# Altium PCB Counts_PCB.PcbDoc (part 2 of 2)
Units mil, origin at the board's own origin, x right, y up, seen from the top; angles counter-clockwise.
Board outline 3474.97 x 2159.98 mil, 2 copper layers (Top Layer, Bottom Layer); 162 components, 85 nets, 521 pads, 0 vias.
Unrouted connection lines stored in the file: 338.
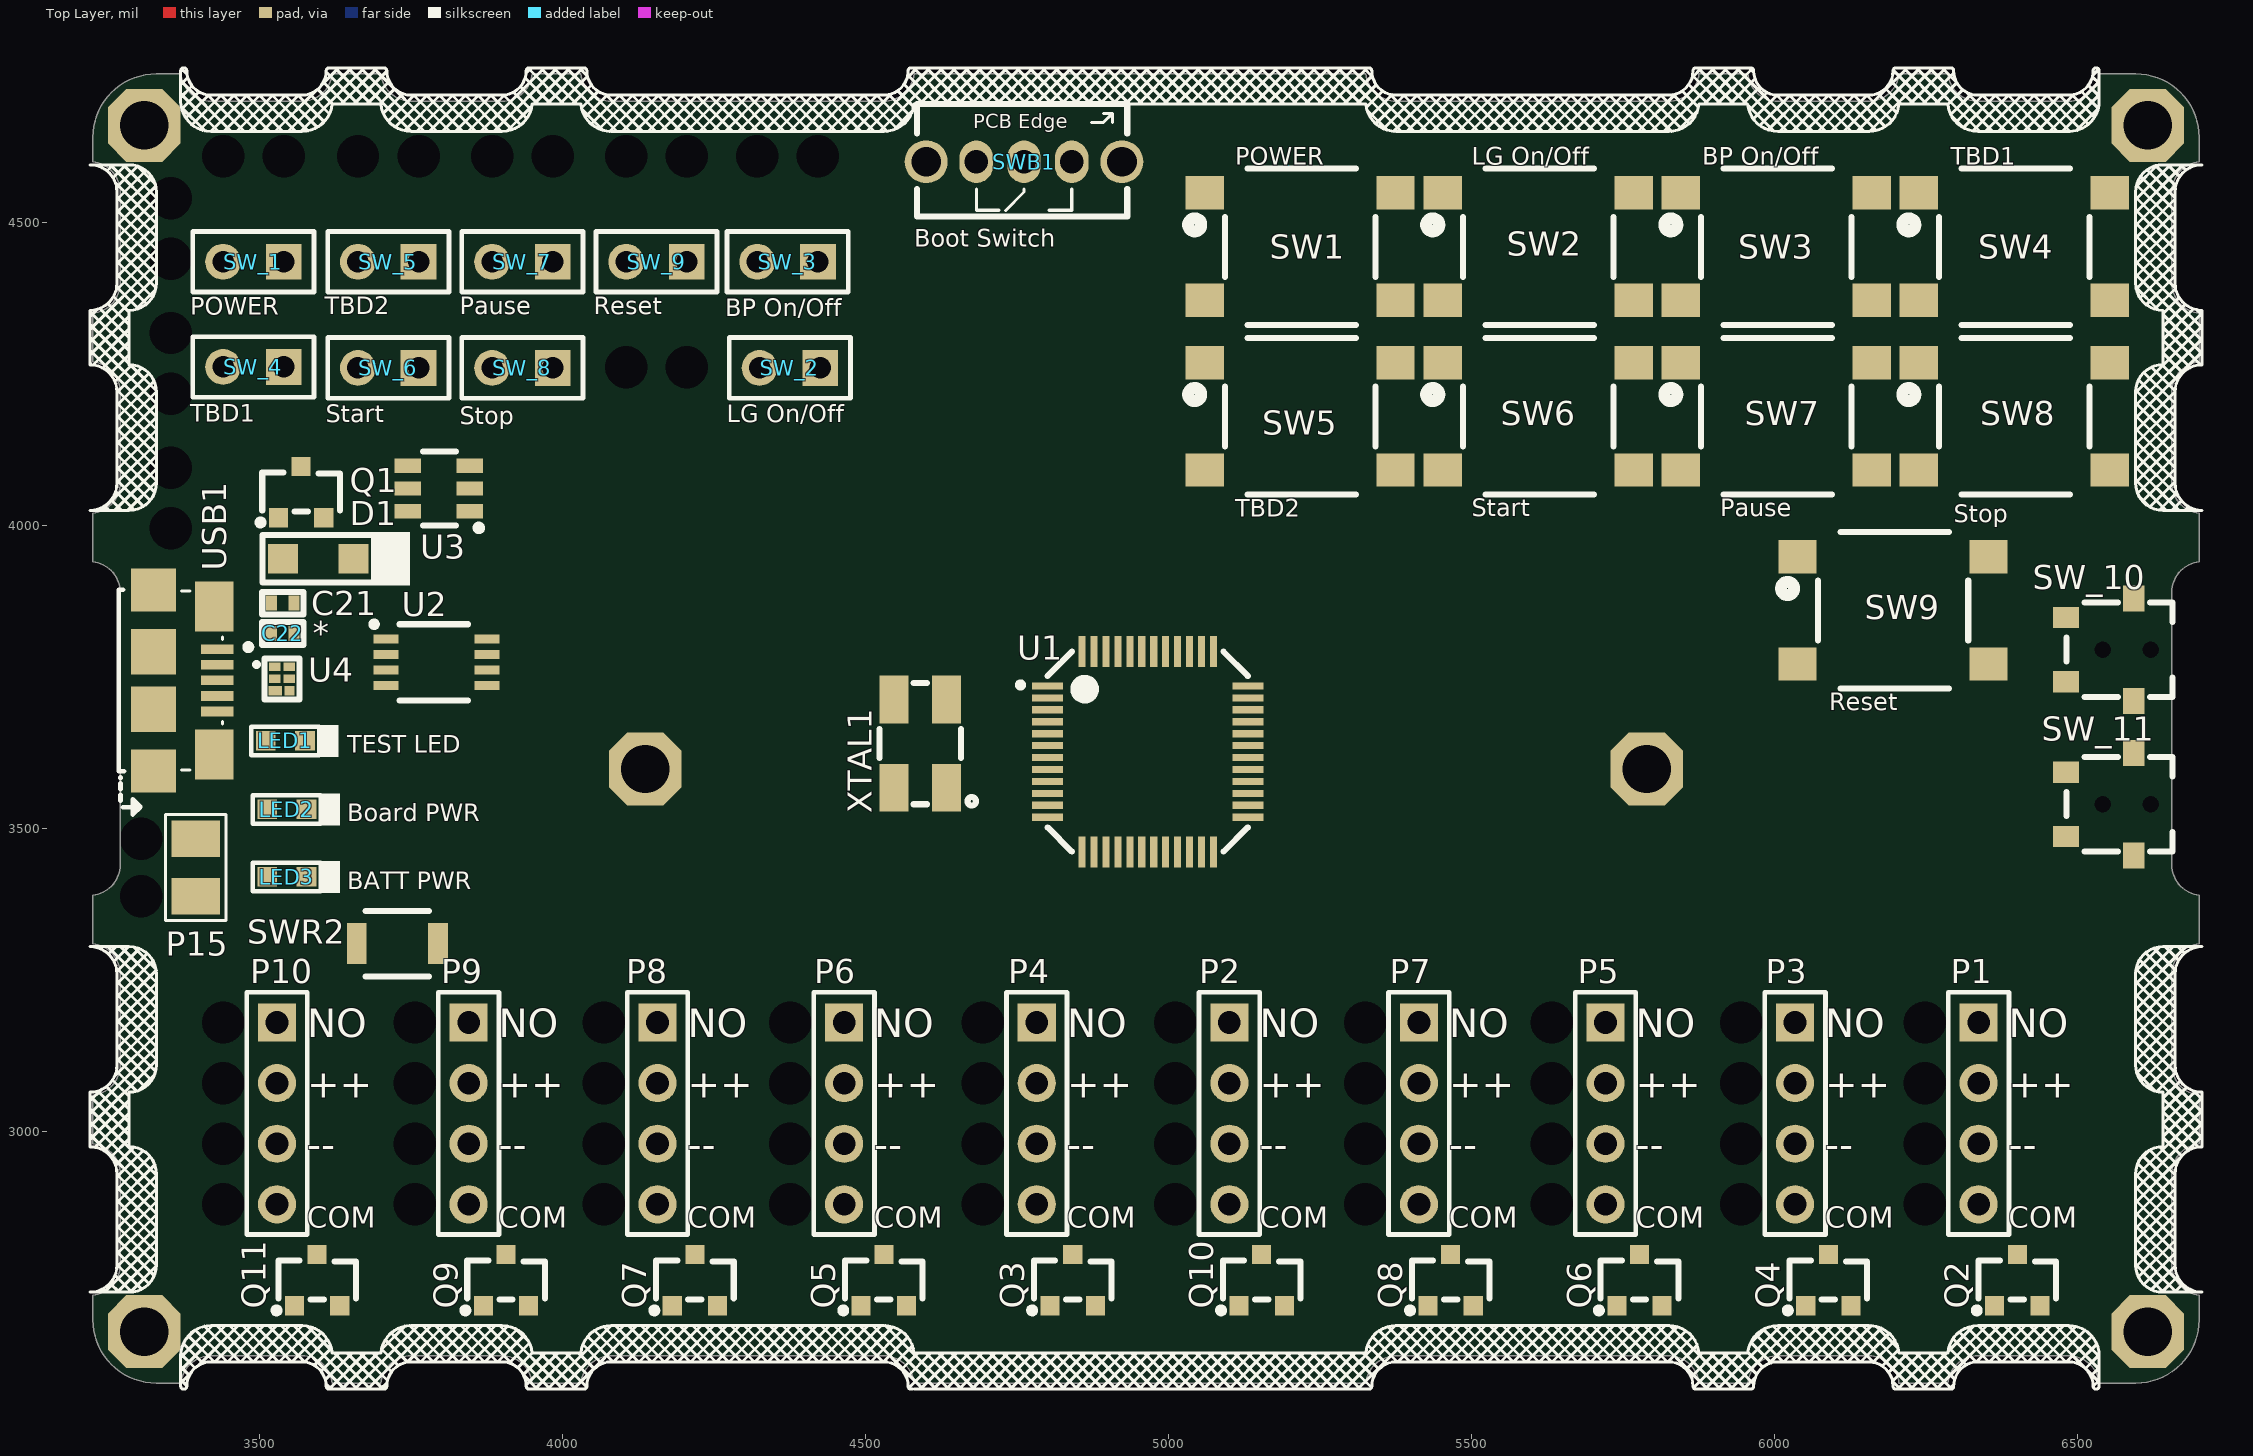
[diagram p0: Top Layer view]

## Part data (continued)
R10: library part ERJ-2GEJ102X, "RES SMD 1K OHM 5% 1/10W 0402", Case/Package=0402, Case Code (Metric)=1005, Manufacturer=Panasonic, Max Operating Temperature=155°C, Max Power Dissipation=100mW, Min Operating Temperature=-55°C, Package Quantity=1, Resistance=1kR, Supplier Part Number 1=P1.0KJCT-ND, Temperature Coefficient=200ppm/°C, Tolerance=5%, Voltage Rating=50V, Case Code (Imperial)=0402, ComponentLink1Description=https://industrial.panasonic.com/cdbs/www-data/pdf/RDA0000/AOA0000C301.pdf?src-supplier=Future+Electronics, ComponentLink1URL=https://industrial.panasonic.com/cdbs/www-data/pdf/RDA0000/AOA0000C301.pdf?src-supplier=Future+Electronics, ComponentLink2Description=http://www.jameco.com/Jameco/Products/ProdDS/1986781.pdf?src-supplier=Jameco, ComponentLink2URL=http://www.jameco.com/Jameco/Products/ProdDS/1986781.pdf?src-supplier=Jameco, ComponentLink3Description=http://www.farnell.com/datasheets/2059623.pdf?src-supplier=Farnell, ComponentLink3URL=http://www.farnell.com/datasheets/2059623.pdf?src-supplier=Farnell, ComponentLink4Description=http://industrial.panasonic.com/www-data/pdf/AOA0000/AOA0000CE1.pdf?src-supplier=Avnet, ComponentLink4URL=http://industrial.panasonic.com/www-data/pdf/AOA0000/AOA0000CE1.pdf?src-supplier=Avnet, ComponentLink5Description=http://www.alliedelec.com/m/d/51cd0790071e1666bdb9d00c57fcf960.pdf?src-supplier=Allied+Electronics, ComponentLink5URL=http://www.alliedelec.com/m/d/51cd0790071e1666bdb9d00c57fcf960.pdf?src-supplier=Allied+Electronics, ComponentLink6Description=http://industrial.panasonic.com/www-data/pdf/AOA0000/AOA0000CE1.pdf?src-supplier=Avnet+Europe, ComponentLink6URL=http://industrial.panasonic.com/www-data/pdf/AOA0000/AOA0000CE1.pdf?src-supplier=Avnet+Europe, ComponentLink7Description=http://www.farnell.com/datasheets/2059623.pdf?src-supplier=Element14, ComponentLink7URL=http://www.farnell.com/datasheets/2059623.pdf?src-supplier=Element14, ComponentLink8Description=http://industrial.panasonic.com/cdbs/www-data/pdf/RDA0000/AOA0000C301.pdf?src-supplier=Farnell, ComponentLink8URL=http://industrial.panasonic.com/cdbs/www-data/pdf/RDA0000/AOA0000C301.pdf?src-supplier=Farnell, ComponentLink9Description=http://industrial.panasonic.com/www-data/pdf/AOA0000/AOA0000CE1.pdf?src-supplier=Avnet+Asia, ComponentLink9URL=http://industrial.panasonic.com/www-data/pdf/AOA0000/AOA0000CE1.pdf?src-supplier=Avnet+Asia, Composition="Thick Film", Contact Plating=Tin, Depth=0.5mm, Features="Automotive AEC-Q200", Height=0.35mm, Lead Free="Lead Free", Length=1mm, Manufacturer Part Number=ERJ-2GEJ102X, Military Standard=Not, Mount="Surface Mount", Number of Terminations=2, Packaging="Tape and Reel", Power Rating=100mW, Pricing 1="1=0.1, 10=0.032, 100=0.0129, 1000=0.00578, 2500=0.00502, 5000=0.00414 (USD)", Radiation Hardening=No, REACH SVHC="No SVHC", Stock 1=3855795, Supplier 1=Digi-Key, Termination=SMD/SMT, Voltage Rating (DC)=50V, Width=0.02inch, Working Voltage=50V
R31 R33 R35 R37 R39 R41 R43 R45 R47 R49: library part RC0402FR-074K7L, "RES SMD 4.7K OHM 1% 1/16W 0402", Case/Package=0402, Case Code (Metric)=1005, Manufacturer=Yageo, Max Operating Temperature=155°C, Min Operating Temperature=-55°C, Power Rating=62.5mW, Resistance=4.7kR, Supplier Part Number 1=311-4.7KLRCT-ND, Temperature Coefficient=100ppm/°C, Tolerance=1%, Voltage Rating=50V, Case Code (Imperial)=0402, ComponentLink1Description=http://www.farnell.com/datasheets/1018594.pdf?src-supplier=Element14, ComponentLink1URL=http://www.farnell.com/datasheets/1018594.pdf?src-supplier=Element14, ComponentLink2Description=https://www.verical.com/server-webapp/html/getDatasheet?partID=328119&src-supplier=Verical, ComponentLink2URL=https://www.verical.com/server-webapp/html/getDatasheet?partID=328119&src-supplier=Verical, ComponentLink3Description=http://www.farnell.com/datasheets/1686128.pdf?src-supplier=Element14, ComponentLink3URL=http://www.farnell.com/datasheets/1686128.pdf?src-supplier=Element14, Composition="Thick Film", Depth=0.5mm, Height=0.32mm, Lead Free="Lead Free", Length=1mm, Manufacturer Part Number 1=RC0402FR-074K7L, Military Standard=Not, Number of Pins=2, Packaging="Tape and Reel", Pricing 1="1=0.1, 10=0.016, 100=0.0067, 1000=0.003, 2500=0.0026, 5000=0.0022 (USD)", REACH SVHC="No SVHC", Stock 1=26143098, Supplier 1=Digi-Key, Termination=SMD/SMT, Voltage Rating (DC)=50V, Width=0.5mm
R32 R34 R36 R38 R40 R42 R44 R46 R48 R50: library part RC0402FR-0747KL, "RES SMD 47K OHM 1% 1/16W 0402", Case/Package=0402, Case Code (Metric)=1005, Manufacturer=Yageo, Max Operating Temperature=155°C, Max Power Dissipation=63mW, Min Operating Temperature=-55°C, Package Quantity=1, Power Rating=62.5mW, Resistance=47kR, Supplier Part Number 1=311-47.0KLRDKR-ND, Temperature Coefficient=100ppm/°C, Tolerance=1%, Voltage Rating=50V, Case Code (Imperial)=0402, ComponentLink1Description=http://www.yageo.com/documents/recent/PYu-RC0402_51_RoHS_L_6_r.pdf?src-supplier=Future+Electronics, ComponentLink1URL=http://www.yageo.com/documents/recent/PYu-RC0402_51_RoHS_L_6_r.pdf?src-supplier=Future+Electronics, ComponentLink2Description=http://www.farnell.com/datasheets/1018594.pdf?src-supplier=Element14, ComponentLink2URL=http://www.farnell.com/datasheets/1018594.pdf?src-supplier=Element14, ComponentLink3Description=https://www.verical.com/server-webapp/html/getDatasheet?partID=323748&src-supplier=Verical, ComponentLink3URL=https://www.verical.com/server-webapp/html/getDatasheet?partID=323748&src-supplier=Verical, ComponentLink4Description=http://www.yageo.com/documents/recent/PYu-RC_Group_51_RoHS_L_10.pdf?src-supplier=Digi-Key, ComponentLink4URL=http://www.yageo.com/documents/recent/PYu-RC_Group_51_RoHS_L_10.pdf?src-supplier=Digi-Key, Composition="Thick Film", Depth=0.5mm, Features="Moisture Resistant", Height=0.016inch, Lead Free="Lead Free", Length=1mm, Manufacturer Part Number=RC0402FR-0747KL, Military Standard=Not, Number of Terminations=2, Packaging="Tape and Reel", Pricing 1="1=0.1, 10=0.016, 100=0.0064, 1000=0.00289, 2500=0.00251, 5000=0.00207 (USD)", REACH SVHC=Unknown, Stock 1=0, Supplier 1=Digi-Key, Termination=SMD/SMT, Width=0.5mm
R51 R52: library part RT0402FRE0727RL, "RES SMD 27 OHM 1% 1/16W 0402", Case/Package=0402, Case Code (Metric)=1005, Manufacturer=Yageo, Max Operating Temperature=125°C, Max Power Dissipation=63mW, Min Operating Temperature=-55°C, Package Quantity=10000, Power Rating=62.5mW, Supplier Part Number 1=YAG3343CT-ND, Temperature Coefficient=50ppm/°C, Tolerance=1%, Voltage Rating=50V, Case Code (Imperial)=0402, ComponentLink1Description=http://www.yageo.com/NewPortal/yageodocoutput?fileName=/pdf/R-Chip/PYu-RT_1-to-0.05_RoHS_L_5.pdf&src-supplier=Digi-Key, ComponentLink1URL=http://www.yageo.com/NewPortal/yageodocoutput?fileName=/pdf/R-Chip/PYu-RT_1-to-0.05_RoHS_L_5.pdf&src-supplier=Digi-Key, ComponentLink2Description=http://www.mouser.com/ds/2/447/yageodocoutput-1125656.pdf?src-supplier=Mouser, ComponentLink2URL=http://www.mouser.com/ds/2/447/yageodocoutput-1125656.pdf?src-supplier=Mouser, Composition="Thin Film", Depth=0.5mm, Features="Moisture Resistant", Height=0.014inch, Lead Free="Lead Free", Length=1mm, Manufacturer Part Number 1=RT0402FRE0727RL, Military Standard=Not, Number of Terminations=2, Packaging="Tape and Reel", Pricing 1="1=0.1, 10=0.072, 100=0.0277, 1000=0.0122, 2500=0.0105, 5000=0.0094 (USD)", Resistance=27R, Stock 1=26946, Supplier 1=Digi-Key, Termination=SMD/SMT, Voltage Rating (DC)=50V, Width=0.02inch
SW1 SW2 SW3 SW4 SW5 SW6 SW7 SW8 SW9: "SWITCH TACTILE SPST-NO 0.05A 24V", Case/Package=SMD/SMT, Contact Resistance=100mR, Current Rating=50mA, Manufacturer=Omron, Max Operating Temperature=70°C, Max Voltage Rating (DC)=24V, Min Operating Temperature=-20°C, Operating Force=1.47N, Package Quantity=1, Supplier Part Number 1=SW1237CT-ND, Actuator Length=1.7mm, Actuator Type=Standard, ComponentLink1Description=https://omronfs.omron.com/en_US/ecb/products/pdf/en-b3fs.pdf?src-supplier=Digi-Key, ComponentLink1URL=https://omronfs.omron.com/en_US/ecb/products/pdf/en-b3fs.pdf?src-supplier=Digi-Key, ComponentLink2Description=http://omronfs.omron.com/en_US/ecb/products/pdf/en-b3fs.pdf?src-supplier=Digi-Key, ComponentLink2URL=http://omronfs.omron.com/en_US/ecb/products/pdf/en-b3fs.pdf?src-supplier=Digi-Key, Contact Plating=Silver, Depth=8mm, Electrical Life=300000Cycles, Illumination Type=Non-Illuminated, Length=6.3mm, Manufacturer Part Number=B3FS-1012P, Max Current Rating=50mA, Mechanical Life=300000Cycles, Mount="Surface Mount", Orientation=Straight, Packaging="Tape and Reel", Pricing 1="1=0.59, 10=0.569, 25=0.548, 100=0.4741, 250=0.43192, 500=0.40034 (USD)", Radiation Hardening=No, Stock 1=177804, Supplier 1=Digi-Key, Switch Function=Off-Mom, Switch Travel=0.25mm, Termination="Gull Wing", Throw Configuration=SPST, Voltage Rating (DC)=24V, Weight=0.2g
SW_1 SW_2 SW_3 SW_4 SW_5 SW_6 SW_7 SW_8 SW_9: library part "Header 1x2", "CONN HEADER VERT 2POS 2.54MM", Color=Black, Current Rating=3A, Manufacturer="Wurth Electronics", Max Operating Temperature=125°C, Min Operating Temperature=-40°C, Supplier Part Number 1=732-5315-ND, Voltage Rating=250V, ComponentLink1Description=http://www.mouser.com/ds/2/445/6130xx11121-538006.pdf?src-supplier=Mouser, ComponentLink1URL=http://www.mouser.com/ds/2/445/6130xx11121-538006.pdf?src-supplier=Mouser, Connector Type="Male Pin", Contact Gender=Male, Contact Material="Copper Alloy,Copper", Contact Mating Length=0.236inch, Contact Plating=Gold, Gender=Male, Housing Material=PBT, Lead Free="Lead Free", Manufacturer Part Number=61300211121, Mount="Through Hole", Number of Contacts=2, Number of Positions=2, Number of Rows=1, Packaging=Bulk, Pitch=0.1inch, Pricing 1="1=0.13, 10=0.106, 25=0.088, 50=0.074, 100=0.067, 1000=0.061 (USD)", REACH SVHC=Unknown, Stock 1=219205, Supplier 1=Digi-Key, Termination="Through Hole"
SW_10 SW_11: "SWITCH DETECTOR SPST-NC 10MA 5V", Contact Current Rating=10mA, Contact Resistance=500mR, Manufacturer=Panasonic, Max Operating Temperature=60°C, Max Voltage Rating (DC)=5V, Min Operating Temperature=-10°C, Operating Force=0.3N, Operating Position=0.102inch, Package Quantity=1, Supplier Part Number 1=P13373SCT-ND, Actuator Length=2.15mm, Actuator Type=Lever, ComponentLink1Description=https://industrial.panasonic.com/cdbs/www-data/pdf/ATB0000/ATB0000C8.pdf?src-supplier=Digi-Key, ComponentLink1URL=https://industrial.panasonic.com/cdbs/www-data/pdf/ATB0000/ATB0000C8.pdf?src-supplier=Digi-Key, ComponentLink2Description=http://www.farnell.com/datasheets/1520574.pdf?src-supplier=Newark, ComponentLink2URL=http://www.farnell.com/datasheets/1520574.pdf?src-supplier=Newark, ComponentLink3Description=https://www.distrelec.biz/Web/Downloads/_t/ds/ese18_eng_tds.pdf?mime=application%2Fpdf&src-supplier=Distrelec, ComponentLink3URL=https://www.distrelec.biz/Web/Downloads/_t/ds/ese18_eng_tds.pdf?mime=application%2Fpdf&src-supplier=Distrelec, ComponentLink4Description=http://www.farnell.com/datasheets/1728953.pdf?src-supplier=Element14, ComponentLink4URL=http://www.farnell.com/datasheets/1728953.pdf?src-supplier=Element14, Current Rating=10mA, Electrical Life=50000Cycles, Height=1.2mm, Lead Free="Lead Free", Manufacturer Part Number=ESE-18R61D, Mechanical Life=50000Cycles, Mount="Surface Mount", Number of Terminals=2, Orientation="Right Angle", Packaging="Tape and Reel", Pricing 1="1=1, 10=0.962, 25=0.8992, 100=0.7807, 250=0.7104, 500=0.6586, 1000=0.6105, 2500=0.555 (USD)", REACH SVHC="No SVHC", Stock 1=39873, Supplier 1=Digi-Key, Switch Function=On-Mom, Termination=SMD/SMT, Throw Configuration=SPST, Voltage Rating (DC)=5V, Width=4mm
SWB1: "2 Position SPDT Miniature Slide Switch 100MA 12V Through Hole, Right Angle", Contact Current Rating=100mA, Contact Resistance=20mR, Insulation Resistance=100MR, Manufacturer="ITT C&K", Max Operating Temperature=70°C, Max Voltage Rating (DC)=12V, Min Operating Temperature=-10°C, Package Quantity=300, Supplier Part Number 1=CKN9559-ND, Actuator Length=4mm, Actuator Material=Polyoxymethylene,Acetal,Polyacetal, Actuator Type=Standard, Body Material=Tin, ComponentLink1Description=http://www.jameco.com/Jameco/Products/ProdDS/588220.pdf?src-supplier=Jameco, ComponentLink1URL=http://www.jameco.com/Jameco/Products/ProdDS/588220.pdf?src-supplier=Jameco, ComponentLink2Description=http://uk.rs-online.com/webdocs/1263/0900766b81263f61.pdf?src-supplier=RSComponents, ComponentLink2URL=http://uk.rs-online.com/webdocs/1263/0900766b81263f61.pdf?src-supplier=RSComponents, ComponentLink3Description=http://www.farnell.com/datasheets/1683358.pdf?src-supplier=Element14, ComponentLink3URL=http://www.farnell.com/datasheets/1683358.pdf?src-supplier=Element14, ComponentLink4Description=http://www1.futureelectronics.com/doc/C%20-%20K%20COMPONENTS/OS102011MA1QN1.pdf?src-supplier=Future+Electronics, ComponentLink4URL=http://www1.futureelectronics.com/doc/C%20-%20K%20COMPONENTS/OS102011MA1QN1.pdf?src-supplier=Future+Electronics, ComponentLink5Description=https://www.ckswitches.com/media/1428/os.pdf?src-supplier=Digi-Key, ComponentLink5URL=https://www.ckswitches.com/media/1428/os.pdf?src-supplier=Digi-Key, ComponentLink6Description=https://www.alliedelec.com/m/d/08271ccc8b1809c6b911a7d3c93f3e8a.pdf?src-supplier=Allied+Electronics, ComponentLink6URL=https://www.alliedelec.com/m/d/08271ccc8b1809c6b911a7d3c93f3e8a.pdf?src-supplier=Allied+Electronics, ComponentLink7Description=http://www.farnell.com/datasheets/2674787.pdf?src-supplier=Newark, ComponentLink7URL=http://www.farnell.com/datasheets/2674787.pdf?src-supplier=Newark, Contact Material="Copper Alloy,Brass,Silver", Contact Plating=Silver,Gold, Contact Style=Non-Shorting, Current Rating=100mA, Depth=8.4mm, Electrical Life=10000Cycles, Housing Material=Resin, Lead Free="Lead Free", Length=8.6mm, Manufacturer Part Number=OS102011MA1QN1, Max Current Rating=100mA, Mechanical Life=10000Cycles, Mount="Through Hole,Brackets,PCB", Orientation="Right Angle", Packaging=Bulk, Pricing 1="1=0.38, 10=0.363, 25=0.3552, 50=0.3176, 100=0.3024, 250=0.2948, 500=0.2495, 1000=0.2419, 5000=0.2117 (USD)", Radiation Hardening=No, REACH SVHC="No SVHC", Stock 1=24069, Supplier 1=Digi-Key, Switch Function=On-On, Switch Travel=2mm, Termination="PC Pins", Throw Configuration=SPDT, Voltage Rating (DC)=12V, Width=4.4mm
SWR2: "SWITCH TACTILE SPST-NO 0.05A 12V", Contact Current Rating=50mA, Contact Resistance=100mR, Insulation Resistance=100MR, Manufacturer=Omron, Max Operating Temperature=70°C, Max Voltage Rating (DC)=12V, Min Operating Temperature=-25°C, Operating Force=1.5N, Package Quantity=1, Ratings="Dust Proof,IP40", Supplier Part Number 1=SW1020DKR-ND, Actuator Length=0.4mm, Actuator Type=Standard, ComponentLink1Description=http://www.farnell.com/datasheets/60838.pdf?src-supplier=Farnell, ComponentLink1URL=http://www.farnell.com/datasheets/60838.pdf?src-supplier=Farnell, ComponentLink2Description=http://www.farnell.com/datasheets/60838.pdf?src-supplier=Element14, ComponentLink2URL=http://www.farnell.com/datasheets/60838.pdf?src-supplier=Element14, ComponentLink3Description=https://omronfs.omron.com/en_US/ecb/products/pdf/en-b3u.pdf?src-supplier=Digi-Key, ComponentLink3URL=https://omronfs.omron.com/en_US/ecb/products/pdf/en-b3u.pdf?src-supplier=Digi-Key, ComponentLink4Description=http://www.omron.com/ecb/products/pdf/en-b3u.pdf?src-supplier=Digi-Key, ComponentLink4URL=http://www.omron.com/ecb/products/pdf/en-b3u.pdf?src-supplier=Digi-Key, ComponentLink5Description=https://www.distrelec.biz/Web/Downloads/he/et/B3U_eng_datasheet.pdf?mime=application%2Fpdf&src-supplier=Distrelec, ComponentLink5URL=https://www.distrelec.biz/Web/Downloads/he/et/B3U_eng_datasheet.pdf?mime=application%2Fpdf&src-supplier=Distrelec, ComponentLink6Description=http://www.onlinecomponents.com/productFiles/mf-OM/en-b3u.pdf?src-supplier=Onlinecomponents.com, ComponentLink6URL=http://www.onlinecomponents.com/productFiles/mf-OM/en-b3u.pdf?src-supplier=Onlinecomponents.com, ComponentLink7Description=https://www.verical.com/server-webapp/html/getDatasheet?partID=552554&src-supplier=Verical, ComponentLink7URL=https://www.verical.com/server-webapp/html/getDatasheet?partID=552554&src-supplier=Verical, ComponentLink8Description=http://www.farnell.com/datasheets/1685550.pdf?src-supplier=Element14, ComponentLink8URL=http://www.farnell.com/datasheets/1685550.pdf?src-supplier=Element14, ComponentLink9Description=http://www.farnell.com/datasheets/2610940.pdf?src-supplier=Farnell, ComponentLink9URL=http://www.farnell.com/datasheets/2610940.pdf?src-supplier=Farnell, ComponentLink10Description=https://www.alliedelec.com/m/d/4c8a9ef82804fc3c241a13c1e298fd73.pdf?src-supplier=Allied+Electronics, ComponentLink10URL=https://www.alliedelec.com/m/d/4c8a9ef82804fc3c241a13c1e298fd73.pdf?src-supplier=Allied+Electronics, Contact Material=Silver, Current Rating=50mA, Depth=2.5mm, Electrical Life=200000Cycles, Height=1.2mm, Illumination Type=Non-Illuminated,Illuminated, Lead Free="Lead Free", Length=4mm, Manufacturer Part Number=B3U-1000P, Max Current Rating=50mA, Mechanical Life=200000Cycles, Mount="Surface Mount", Orientation=Straight, Packaging="Tape and Reel", Pricing 1="1=1, 10=0.961, 25=0.9064, 50=0.7976, 100=0.7251, 250=0.68888, 500=0.67074, 1000=0.52571 (USD)", REACH SVHC=Unknown, Stock 1=116454, Supplier 1=Digi-Key, Switch Function=Off-Mom, Switch Travel=0.15mm, Termination=SMD/SMT, Throw Configuration=SPST, Voltage Rating (DC)=12V, Weight=0.000776oz, Width=3mm
U1: "IC MCU 32BIT 128KB FLASH 48LQFP"
U2: "IC REG LINEAR 3.3V 500MA MICRO8", Case/Package=MSOP, Dropout Voltage=340mV, Manufacturer="ON Semiconductor", Max Input Voltage=16V, Max Operating Temperature=150°C, Max Output Current=800mA, Min Input Voltage=2.6V, Min Operating Temperature=-40°C, Min Output Voltage=3.3V, Output Voltage Accuracy=0.9%, Package Quantity=4000, Reference Voltage=1.269V, Supplier Part Number 1=NCP3335ADM330R2GOSCT-ND, Accuracy=0.9%, ComponentLink1Description=http://www.onsemi.com/pub_link/Collateral/NCP3335A-D.PDF?src-supplier=Future+Electronics, ComponentLink1URL=http://www.onsemi.com/pub_link/Collateral/NCP3335A-D.PDF?src-supplier=Future+Electronics, ComponentLink2Description=http://www.onsemi.com/pub/Collateral/NCP3335A-D.PDF?src-supplier=Digi-Key, ComponentLink2URL=http://www.onsemi.com/pub/Collateral/NCP3335A-D.PDF?src-supplier=Digi-Key, Halogen Free="Halogen Free", Height=0.95mm, Lead Free="Lead Free", Length=3.1mm, Manufacturer Part Number=NCP3335ADM330R2G, Mount="Surface Mount", Number of Outputs=1, Number of Pins=8, Number of Regulators=1, Output Current=800mA, Output Type=Fixed, Output Voltage=3.3V, Packaging="Tape and Reel", Polarity=Positive, Pricing 1="1=1.12, 10=1.003, 25=0.952, 100=0.731, 250=0.646, 500=0.612, 1000=0.476 (USD)", Radiation Hardening=No, Stock 1=2299, Supplier 1=Digi-Key, Width=3.1mm
U3: "IC BAT CHG LI-ION 1 CELL SOT23-6", Manufacturer="Texas Instruments", Supplier Part Number 1=296-47315-1-ND, Lead Free="Lead Free", Manufacturer Part Number=BQ21040DBVR, Number of Cells=1, Pricing 1="1=1.14, 10=1.015, 100=0.7912, 500=0.65364, 1000=0.51603 (USD)", Stock 1=10857, Supplier 1=Digi-Key
U4: "TVS DIODE 5V 6.8V 6UDFN", Capacitance=1E-12F, Clamping Voltage=6.8V, Manufacturer=Littelfuse, Max Operating Temperature=125°C, Max Surge Current=8A, Min Operating Temperature=-40°C, Package Quantity=3000, Power Line Protection=Yes, Reverse Standoff Voltage=5V, Supplier Part Number 1=F6501DKR-ND, ComponentLink1Description=http://www.mouser.com/ds/2/240/Littelfuse_TVS_Diode_Array_SP3014_Datasheet.pdf-364113.pdf?src-supplier=Mouser, ComponentLink1URL=http://www.mouser.com/ds/2/240/Littelfuse_TVS_Diode_Array_SP3014_Datasheet.pdf-364113.pdf?src-supplier=Mouser, ComponentLink2Description=https://www.littelfuse.com/~/media/electronics/datasheets/tvs_diode_arrays/littelfuse_tvs_diode_array_sp3014_datasheet.pdf.pdf?src-supplier=Digi-Key, ComponentLink2URL=https://www.littelfuse.com/~/media/electronics/datasheets/tvs_diode_arrays/littelfuse_tvs_diode_array_sp3014_datasheet.pdf.pdf?src-supplier=Digi-Key, ComponentLink3Description=http://www.littelfuse.com/~/media/electronics/datasheets/tvs_diode_arrays/littelfuse_tvs_diode_array_sp3014_datasheet.pdf.pdf?src-supplier=Digi-Key, ComponentLink3URL=http://www.littelfuse.com/~/media/electronics/datasheets/tvs_diode_arrays/littelfuse_tvs_diode_array_sp3014_datasheet.pdf.pdf?src-supplier=Digi-Key, ComponentLink4Description=http://www.farnell.com/datasheets/2291833.pdf?src-supplier=Element14, ComponentLink4URL=http://www.farnell.com/datasheets/2291833.pdf?src-supplier=Element14, ComponentLink5Description=http://www.farnell.com/datasheets/2291833.pdf?src-supplier=Farnell, ComponentLink5URL=http://www.farnell.com/datasheets/2291833.pdf?src-supplier=Farnell, ComponentLink6Description=http://www.farnell.com/datasheets/2291833.pdf?src-supplier=Newark, ComponentLink6URL=http://www.farnell.com/datasheets/2291833.pdf?src-supplier=Newark, Height=0.55mm, Length=1.65mm, Manufacturer Part Number=SP3014-02UTG, Mount="Surface Mount", Number of Bidirectional Channels=2, Number of Channels=2, Number of Pins=6, Packaging="Tape and Reel", Peak Pulse Current=8A, Polarity=Unidirectional, Pricing 1="1=0.56, 10=0.495, 25=0.4652, 100=0.3375, 250=0.32552, 500=0.282, 1000=0.24 (USD)", Stock 1=3888, Supplier 1=Digi-Key, Termination=SMD/SMT, Width=1.05mm, Working Voltage=5V
USB1: "CONN USB MICRO B RECPT SMT R/A", Colour=Black, Current Rating=1.8A, Flammability Rating="UL94 V-0", Insulation Resistance=1GR, Manufacturer="Amphenol FCI", Max Operating Temperature=85°C, Max Voltage Rating (AC)=100V, Min Operating Temperature=-55°C, Package Quantity=1400, Supplier Part Number 1=609-4613-1-ND, ComponentLink1Description=https://datasheet.ciiva.com/26853/getdatasheetpartid-418041-26853891.pdf, ComponentLink1URL=https://datasheet.ciiva.com/26853/getdatasheetpartid-418041-26853891.pdf, ComponentLink2Description=https://datasheet.ciiva.com/851/10118192-851112.pdf, ComponentLink2URL=https://datasheet.ciiva.com/851/10118192-851112.pdf, ComponentLink3Description=https://datasheet.ciiva.com/4598/10118192ac-197249-4598796.pdf, ComponentLink3URL=https://datasheet.ciiva.com/4598/10118192ac-197249-4598796.pdf, Connector Type=USB,Receptacle, Contact Material="Copper Alloy", Contact Plating=Nickel,Gold, Depth=5.57mm, Gender=Receptacle, Housing Material=Polymer, Lead Free="Lead Free", Length=7.86mm, Manufacturer Part Number=10118192-0001LF, Mount="Surface Mount,Horizontal", Number of Contacts=5, Number of Ports=1, Number of Terminals=5, Orientation="Right Angle", Packaging="Tape and Reel", Pitch=0.65mm, Pricing 1="1=0.42, 10=0.393, 25=0.3536, 50=0.3144, 100=0.3013, 250=0.2751, 500=0.262 (USD)", Radiation Hardening=No, REACH SVHC="No SVHC", Stock 1=203283, Supplier 1=Digi-Key, Termination=Solder, USB Standard="USB 2.0", Voltage Rating=100V
XTAL1: library part 7B08070001, "CRYSTAL 8.0000MHZ 18PF SMD", Case/Package=SMD/SMT, Frequency=8MHz, Frequency Stability=20ppm, Load Capacitance=18pF, Manufacturer=TXC, Max Operating Temperature=75°C, Min Operating Temperature=-20°C, Supplier Part Number 1=7B08070001-ND, ComponentLink1Description=http://www.txccorp.com/download/products/quartz_crystals/2015TXC_7B_19.pdf?src-supplier=Digi-Key, ComponentLink1URL=http://www.txccorp.com/download/products/quartz_crystals/2015TXC_7B_19.pdf?src-supplier=Digi-Key, ComponentLink2Description=http://www.mouser.com/ds/2/417/7b-5226.pdf?src-supplier=Mouser, ComponentLink2URL=http://www.mouser.com/ds/2/417/7b-5226.pdf?src-supplier=Mouser, Frequency Tolerance=20ppm, Height=0.041inch, Length=0.197inch, Manufacturer Part Number=7B08070001, Mount="Surface Mount", Pricing 1="1000=0.39 (USD)", Stock 1=0, Supplier 1=Digi-Key, Width=0.126inch

## Free pads (board coordinates)
  round 0 hole 70 unplated: 3(3304.79,3388.01) 3(3304.79,3483.01) 3(3353.89,3995.06) 3(3353.89,4095.06) 3(3353.89,4217.56) 3(3353.89,4317.56) 3(3353.89,4440.06) 3(3353.89,4540.06) 3(3440,2880) 3(3440,2980) 3(3440,3080) 3(3440,3180) 3(3440,4608.89) 3(3540,4608.89) 3(3662.5,4608.89) 3(3756.11,2880) 3(3756.11,2980) 3(3756.11,3080) 3(3756.11,3180) 3(3762.5,4608.89) 3(3883.75,4608.89) 3(3983.75,4608.89) 3(4067.78,2880) 3(4067.78,2980) 3(4067.78,3080) 3(4067.78,3180) 3(4105,4261.11) 3(4105,4608.89) 3(4205,4261.11) 3(4205,4608.89) 3(4321.25,4608.89) 3(4375.56,2880) 3(4375.56,2980) 3(4375.56,3080) 3(4375.56,3180) 3(4421.25,4608.89) 3(4693.33,2880) 3(4693.33,2980) 3(4693.33,3080) 3(4693.33,3180) 3(5011.11,2880) 3(5011.11,2980) 3(5011.11,3080) 3(5011.11,3180) 3(5323.89,2880) 3(5323.89,2980) 3(5323.89,3080) 3(5323.89,3180) 3(5631.67,2880) 3(5631.67,2980) 3(5631.67,3080) 3(5631.67,3180) 3(5944.44,2880) 3(5944.44,2980) 3(5944.44,3080) 3(5944.44,3180) 3(6247.22,2880) 3(6247.22,2980) 3(6247.22,3080) 3(6247.22,3180)
  oct 120x120 hole 80: MH(3310,2670) MH(3310,4660) MH(4136.18,3598.19) MH(5788.54,3598.19) MH(6615,2670) MH(6615,4660)

## Nets (pads, with @x,y where several pads share a name; then routed paths per layer and width w, separated by ;. In a path a pad name is that pad's centre, name@x,y a point inside that pad or via, vN(x,y) a via of type N, cw(c..) or ccw(c..) an arc to the next point about the centre after c; other vN are vias at no path point)
\S\D\: R2.1 U2.6
ACT1: C111.1 P1.4 R11.1 U1.10
ACT2: C112.1 P3.4 R13.1 U1.11
ACT3: C113.1 P5.4 R15.1 U1.12
ACT4: C114.1 P7.4 R17.1 U1.13
ACT5: C115.1 P2.4 R19.1 U1.14
ACT6: C116.1 P4.4 R21.1 U1.15
ACT7: C117.1 P6.4 R23.1 U1.16
ACT8: C118.1 P8.4 R25.1 U1.17
ACT9: C119.1 P9.4 R27.1 U1.29
ACT10: C120.1 P10.4 R29.1 U1.30
BLED1: P1.2 R12.1
BLED2: P3.2 R14.1
BLED3: P5.2 R16.1
BLED4: P7.2 R18.1
BLED5: P2.2 R20.1
BLED6: P4.2 R22.1
BLED7: P6.2 R24.1
BLED8: P8.2 R26.1
BLED9: P9.2 R28.1
BLED10: P10.2 R30.1
BOOT0#: SWB1.2 U1.44
CHG: LED3.2 U3.3
DM: C23.1 R51.1 U1.32
DP: C24.1 R52.1 U1.33
GND: C1.1 C2.2 C3.2 C4.2 C5.2 C6.2 C7.2 C8.2 C9.2 C10.2 C11.2 C12.2 C13.2 C14.2 C15.2 C16.2 C17.2 C18.1 C19.2 C20.2 C21.2 C22.2 C23.2 C24.2 C100.2 C101.2 C102.2 C103.2 C104.2 C105.2 C106.2 C107.2 C108.2 C109.2 C110.2 C111.2 C112.2 C113.2 C114.2 C115.2 C116.2 C117.2 C118.2 C119.2 C120.2 LED2.2 P1.1 P2.1 P3.1 P4.1 P5.1 P6.1 P7.1 P8.1 P9.1 P10.1 P15.2 Q2.2 Q3.2 Q4.2 Q5.2 Q6.2 Q7.2 Q8.2 Q9.2 Q10.2 Q11.2 R1.1 R3.1 R4.1 R8.2 R10.1 R32.1 R34.1 R36.1 R38.1 R40.1 R42.1 R44.1 R46.1 R48.1 R50.1 SW1.3 SW2.3 SW3.3 SW4.3 SW5.3 SW6.3 SW7.3 SW8.3 SW9.3 SW_1.2 SW_2.2 SW_3.2 SW_4.2 SW_5.2 SW_6.2 SW_7.2 SW_8.2 SW_9.2 SW_10.2 SW_11.2 SWR2.1 U1.8 U1.23 U1.35 U1.47 U2.4 U3.5 U4.3 U4.4 USB1.5 USB1.MP1 USB1.MP2 USB1.MP3 USB1.MP4 USB1.MP5 USB1.MP6 XTAL1.2 XTAL1.4
ISET: R3.2 U3.4
LCTRL1: R31.1 U1.18
LCTRL2: R35.1 U1.19
LCTRL3: R39.1 U1.20
LCTRL4: R43.1 U1.39
LCTRL5: R47.1 U1.40
LCTRL6: R33.1 U1.41
LCTRL7: R37.1 U1.42
LCTRL8: R41.1 U1.43
LCTRL9: R45.1 U1.45
LCTRL10: R49.1 U1.46
LED1#: P1.3 Q2.3
LED2#: P3.3 Q4.3
LED3#: P5.3 Q6.3
LED4#: P7.3 Q8.3
LED5#: P2.3 Q10.3
LED6#: P4.3 Q3.3
LED7#: P6.3 Q5.3
LED8#: P8.3 Q7.3
LED9#: P9.3 Q9.3
LED10#: P10.3 Q11.3
NetC1_2: C1.2 U2.5
NetLED1_2: LED1.2 R10.2
NetLED2_1: LED2.1 R5.1
NetLED3_1: LED3.1 R6.1
NetQ2_1: Q2.1 R31.2 R32.2
NetQ3_1: Q3.1 R33.2 R34.2
NetQ4_1: Q4.1 R35.2 R36.2
NetQ5_1: Q5.1 R37.2 R38.2
NetQ6_1: Q6.1 R39.2 R40.2
NetQ7_1: Q7.1 R41.2 R42.2
NetQ8_1: Q8.1 R43.2 R44.2
NetQ9_1: Q9.1 R45.2 R46.2
NetQ10_1: Q10.1 R47.2 R48.2
NetQ11_1: Q11.1 R49.2 R50.2
NetR7_1: R7.1 SWB1.1
NetR8_1: R8.1 SWB1.3
RST#: C18.2 R9.1 SWR2.2 U1.7
TEST#: LED1.1 U1.2
TS: R4.2 U3.1
TS_1: C100.1 R53.1 SW1.1 SW_1.1 U1.21
TS_2: C101.1 R54.1 SW2.1 SW_2.1 U1.22
TS_3: C102.1 R55.1 SW3.1 SW_3.1 U1.25
TS_4: C103.1 R56.1 SW4.1 SW_4.1 U1.26
TS_5: C104.1 R57.1 SW5.1 SW_5.1 U1.27
TS_6: C105.1 R58.1 SW6.1 SW_6.1 U1.28
TS_7: C106.1 R59.1 SW7.1 SW_7.1 U1.34
TS_8: C107.1 R60.1 SW8.1 SW_8.1 U1.37
TS_9: C108.1 R61.1 SW9.1 SW_9.1 U1.38
TS_10: C109.1 R62.1 SW_10.1 U1.3
TS_11: C110.1 R63.1 SW_11.1 U1.4
USB_D+: R52.2 U4.2 USB1.3
USB_D-: R51.2 U4.1 USB1.2
VBAT: C2.1 C19.1 C20.1 P15.1 Q1.3 R6.2 U3.2
VCC_3V3: C7.1 C8.1 C11.1 C12.1 C13.1 C14.1 C15.1 C16.1 C17.1 R5.2 R7.2 R9.2 R11.2 R12.2 R13.2 R14.2 R15.2 R16.2 R17.2 R18.2 R19.2 R20.2 R21.2 R22.2 R23.2 R24.2 R25.2 R26.2 R27.2 R28.2 R29.2 R30.2 R53.2 R54.2 R55.2 R56.2 R57.2 R58.2 R59.2 R60.2 R61.2 R62.2 R63.2 U1.1 U1.9 U1.24 U1.36 U1.48 U2.1 U2.2 U2.3
VIN: C5.1 C6.1 D1.2 Q1.2 R2.2 U2.7 U2.8
VUSB: C3.1 C4.1 C21.1 C22.1 D1.1 Q1.1 R1.2 U3.6 USB1.1
X0: C10.1 U1.5 XTAL1.1
X1: C9.1 U1.6 XTAL1.3
pads on no net: SW1.2 SW1.4 SW2.2 SW2.4 SW3.2 SW3.4 SW4.2 SW4.4 SW5.2 SW5.4 SW6.2 SW6.4 SW7.2 SW7.4 SW8.2 SW8.4 SW9.2 SW9.4 SW_10.MH1 SW_10.MP1 SW_10.MP2 SW_11.MH1 SW_11.MP1 SW_11.MP2 SWB1.MH1 SWB1.MH2 U1.31 U4.5 U4.6 USB1.4

## Polygon pours and split planes (outlines as drawn)
no net on Top Overlay (hatched 45Degree grid 15 track 5): 3330,4070 cw(c3285,4070) 3285,4025 3220,4025 ccw(c3220,4070) 3265,4070 3265,4220 ccw(c3220,4220) 3220,4265 3220,4355 ccw(c3220,4400) 3265,4400 3265,4550 ccw(c3220,4550) 3220,4595 3285,4595 cw(c3285,4550) 3330,4550 3330,4400 cw(c3285,4400) 3285,4355 3285,4265 cw(c3285,4220) 3330,4220
no net on Top Overlay (hatched 45Degree grid 15 track 5): 3330,2780 cw(c3285,2780) 3285,2735 3220,2735 ccw(c3220,2780) 3265,2780 3265,2930 ccw(c3220,2930) 3220,2975 3220,3065 ccw(c3220,3110) 3265,3110 3265,3260 ccw(c3220,3260) 3220,3305 3285,3305 cw(c3285,3260) 3330,3260 3330,3110 cw(c3285,3110) 3285,3065 3285,2975 cw(c3285,2930) 3330,2930
no net on Top Overlay (hatched 45Degree grid 15 track 5): 6595,2780 ccw(c6640,2780) 6640,2735 6705,2735 cw(c6705,2780) 6660,2780 6660,2930 cw(c6705,2930) 6705,2975 6705,3065 cw(c6705,3110) 6660,3110 6660,3260 cw(c6705,3260) 6705,3305 6640,3305 ccw(c6640,3260) 6595,3260 6595,3110 ccw(c6640,3110) 6640,3065 6640,2975 ccw(c6640,2930) 6595,2930
no net on Top Overlay (hatched 45Degree grid 15 track 5): 6595,4070 ccw(c6640,4070) 6640,4025 6705,4025 cw(c6705,4070) 6660,4070 6660,4220 cw(c6705,4220) 6705,4265 6705,4355 cw(c6705,4400) 6660,4400 6660,4550 cw(c6705,4550) 6705,4595 6640,4595 ccw(c6640,4550) 6595,4550 6595,4400 ccw(c6640,4400) 6640,4355 6640,4265 ccw(c6640,4220) 6595,4220
no net on Top Overlay (hatched 45Degree grid 15 track 5): 3570,4649.99 ccw(c3570,4700) 3619.76,4694.99 3700.24,4694.99 ccw(c3750,4700) 3750,4649.99 3900,4649.99 ccw(c3900,4700) 3949.76,4694.99 4030.24,4694.99 ccw(c4080,4700) 4080,4649.99 ccw(c4080,4655) 4080.09,4649.99 4530,4649.99 ccw(c4530,4700) 4579.76,4694.99 ccw(c4580,4700) 4580,4694.99 4920,4694.99 ccw(c4920,4700) 4920.06,4694.99 5325.24,4694.99 ccw(c5375,4700) 5375,4649.99 ccw(c5375,4655) 5375.07,4649.99 5825,4649.99 ccw(c5825,4700) 5874.76,4694.99 5955.24,4694.99 ccw(c6005,4700) 6005,4649.99 6155,4649.99 ccw(c6155,4700) 6204.76,4694.99 6285.24,4694.99 ccw(c6335,4700) 6335,4649.99 6485,4649.99 ccw(c6485,4700) 6535.02,4700 6535.02,4750 ccw(c6530,4750) 6524.99,4750 cw(c6485,4750) 6485,4710.02 6335,4710.02 cw(c6335,4750) 6295.02,4750 ccw(c6290,4750) 6290,4755.02 6200,4755.02 ccw(c6200,4750) 6196.45,4753.55 cw(c6200,4750) 6200,4755.02 6196.45,4753.55 ccw(c6200,4750) 6194.99,4750 cw(c6155,4750) 6155,4710.02 6005,4710.02 cw(c6005,4750) 5965.02,4750 ccw(c5960,4750) 5960,4755.02 5870,4755.02 ccw(c5870,4750) 5866.45,4753.55 cw(c5870,4750) 5870,4755.02 5866.45,4753.55 ccw(c5870,4750) 5864.99,4750 cw(c5825,4750) 5825.09,4710.02 ccw(c5825,4705) 5825,4710.02 5375,4710.02 ccw(c5375,4705) 5374.93,4710.02 ccw(c5375,4750) 5375,4710.02 5374.93,4710.02 cw(c5375,4750) 5335.02,4750 ccw(c5330,4750) 5333.55,4753.55 ccw(c5330,4750) 5330,4755.02 4920,4755.02 ccw(c4920,4750) 4919.94,4755.02 4580,4755.02 ccw(c4580,4750) 4577.5,4754.35 ccw(c4575,4750) 4569.99,4750 cw(c4530,4750) 4530.07,4710.02 ccw(c4530,4705) 4530,4710.02 4080,4710.02 ccw(c4080,4705) 4079.92,4710.02 ccw(c4080,4750) 4080,4710.02 4079.92,4710.02 cw(c4080,4750) 4040.02,4750 ccw(c4035,4750) 4038.55,4753.55 ccw(c4035,4750) 4035,4755.02 cw(c4035,4750) 4038.55,4753.55 4035,4755.02 3945,4755.02 ccw(c3945,4750) 3939.99,4750 cw(c3900,4750) 3900,4710.02 3750,4710.02 cw(c3750,4750) 3710.02,4750 ccw(c3705,4750) 3708.55,4753.55 ccw(c3705,4750) 3705,4755.02 cw(c3705,4750) 3708.55,4753.55 3705,4755.02 3615,4755.02 ccw(c3615,4750) 3609.99,4750 cw(c3570,4750) 3570,4710.02 3420,4710.02 cw(c3420,4750) 3380.02,4750 ccw(c3375,4750) 3369.99,4750 3369.99,4700 ccw(c3420,4700) 3420,4649.99
no net on Top Overlay (hatched 45Degree grid 15 track 5): 3609.98,2580 ccw(c3615,2580) 3615,2574.98 3705,2574.98 ccw(c3705,2580) 3708.55,2576.45 ccw(c3705,2580) 3710.01,2580 cw(c3750,2580) 3750,2619.98 3900,2619.98 cw(c3900,2580) 3939.98,2580 ccw(c3945,2580) 3945,2574.98 4035,2574.98 ccw(c4035,2580) 4038.55,2576.45 ccw(c4035,2580) 4040.01,2580 cw(c4080,2580) 4079.91,2619.98 cw(c4080,2580) 4080,2619.98 4530,2619.98 ccw(c4530,2625) 4530.07,2619.98 ccw(c4530,2580) 4530,2619.98 4530.07,2619.98 cw(c4530,2580) 4569.98,2580 ccw(c4575,2580) 4577.5,2575.65 ccw(c4580,2580) 4580,2574.98 4920,2574.98 cw(c4920,2580) 4919.94,2574.98 4920,2574.98 5330,2574.98 ccw(c5330,2580) 5333.55,2576.45 ccw(c5330,2580) 5335.01,2580 cw(c5375,2580) 5374.93,2619.98 cw(c5375,2580) 5375,2619.98 5825,2619.98 ccw(c5825,2625) 5825.08,2619.98 ccw(c5825,2580) 5825,2619.98 5825.08,2619.98 cw(c5825,2580) 5864.98,2580 ccw(c5870,2580) 5866.45,2576.45 ccw(c5870,2580) 5870,2574.98 5960,2574.98 ccw(c5960,2580) 5965.01,2580 cw(c6005,2580) 6005,2619.98 6155,2619.98 cw(c6155,2580) 6194.98,2580 ccw(c6200,2580) 6196.45,2576.45 ccw(c6200,2580) 6200,2574.98 6290,2574.98 ccw(c6290,2580) 6295.01,2580 cw(c6335,2580) 6335,2619.98 6485,2619.98 cw(c6485,2580) 6524.98,2580 ccw(c6530,2580) 6535.01,2580 6535.01,2630 ccw(c6485,2630) 6485,2680.01 6335,2680.01 ccw(c6335,2630) 6285.24,2635.01 6204.76,2635.01 ccw(c6155,2630) 6155,2680.01 6005,2680.01 ccw(c6005,2630) 5955.24,2635.01 5874.76,2635.01 ccw(c5825,2630) 5825,2680.01 ccw(c5825,2675) 5824.91,2680.01 5375,2680.01 cw(c5375,2675) 5375.07,2680.01 5375,2680.01 ccw(c5375,2630) 5325.24,2635.01 4920,2635.01 cw(c4920,2630) 4920.06,2635.01 4920,2635.01 4580,2635.01 ccw(c4580,2630) 4579.76,2635.01 ccw(c4530,2630) 4530,2680.01 ccw(c4530,2675) 4529.93,2680.01 4080,2680.01 cw(c4080,2675) 4080.09,2680.01 4080,2680.01 ccw(c4080,2630) 4030.24,2635.01 3949.76,2635.01 ccw(c3900,2630) 3900,2680.01 3750,2680.01 ccw(c3750,2630) 3700.24,2635.01 3619.76,2635.01 ccw(c3570,2630) 3570,2680.01 3420,2680.01 ccw(c3420,2630) 3369.98,2630 3369.98,2580 ccw(c3375,2580) 3380.01,2580 cw(c3420,2580) 3420,2619.98 3570,2619.98 cw(c3570,2580)
no net on Top Overlay (solid): 6870,3890

## Silkscreen, mask and mechanical layers (free items; w line width, h text height)
Top Overlay:
  text "POWER" at 5110,4585 h50
  text "LG On/Off" at 5500,4585 h50
  text "BP On/Off" at 5880,4585 h50
  text "TBD1" at 6290,4585 h50
  text "Boot Switch" at 4580,4450 h50
  text "TBD2" at 3608,4338.83 h50
  text "POWER" at 3386,4337.81 h50
  text "Pause" at 3830,4338.34 h50
  text "Reset" at 4051,4338.34 h50
  text "BP On/Off" at 4268,4335 h50
  text "TBD1" at 3386,4161.32 h50
  text "Start" at 3609,4160.3 h50
  text "LG On/Off" at 4271,4160.3 h50
  text "Stop" at 3830,4156.9 h50
  text "Start" at 5500,4005 h50
  text "Pause" at 5910,4005 h50
  text "TBD2" at 5110,4004.32 h50
  text "Stop" at 6295,3995 h50
  text "*" at 3615,3802.01 h40
  text "Reset" at 6090,3685 h50
  text "TEST LED" at 3645,3615 h50
  text "Board PWR" at 3645,3502.5 h50
  text "BATT PWR" at 3645,3390 h50
  text "NO" at 3578.89,3140 h80
  text "NO" at 3895,3140 h80
  text "NO" at 4206.67,3140 h80
  text "NO" at 4514.44,3140 h80
  text "NO" at 4832.22,3140 h80
  text "NO" at 5150,3140 h80
  text "NO" at 5462.78,3140 h80
  text "NO" at 5770.56,3140 h80
  text "NO" at 6083.33,3140 h80
  text "NO" at 6386.11,3140 h80
  text "++" at 3578.89,3040 h80
  text "++" at 3895,3040 h80
  text "++" at 4206.67,3040 h80
  text "++" at 4514.44,3040 h80
  text "++" at 4832.22,3040 h80
  text "++" at 5150,3040 h80
  text "++" at 5462.78,3040 h80
  text "++" at 5770.56,3040 h80
  text "++" at 6083.33,3040 h80
  text "++" at 6386.11,3040 h80
  text "--" at 3578.89,2940 h80
  text "--" at 3895,2940 h80
  text "--" at 4206.67,2940 h80
  text "--" at 4514.44,2940 h80
  text "--" at 4832.22,2940 h80
  text "--" at 5150,2940 h80
  text "--" at 5462.78,2940 h80
  text "--" at 5770.56,2940 h80
  text "--" at 6083.33,2940 h80
  text "--" at 6386.11,2940 h80
  text "COM" at 3578.89,2830 h60
  text "COM" at 3895,2830 h60
  text "COM" at 4206.67,2830 h60
  text "COM" at 4514.44,2830 h60
  text "COM" at 4832.22,2830 h60
  text "COM" at 5150,2830 h60
  text "COM" at 5462.78,2830 h60
  text "COM" at 5770.56,2830 h60
  text "COM" at 6083.33,2830 h60
  text "COM" at 6386.11,2830 h60
Bottom Overlay:
  drawing of 3102 lines, arcs and shapes, not listed
  text "*" at 4130,4475 h40
  text "*" at 3458.61,4474 h40
  text "*" at 3680.11,4474 h40
  text "*" at 3902.11,4474 h40
  text "*" at 4340.11,4474 h40
  text "*" at 3458.61,4300.5 h40
  text "*" at 3680.11,4299 h40
  text "*" at 3902.11,4299 h40
  text "*" at 4345.11,4299 h40
  text "*" at 3840,4155 h40 r180
  text "*" at 3720,3995 h40 r180
  text "*" at 3910,3830 h40
  text "*" at 6575,3815 h40
  text "*" at 3757,3719 h40
  text "*" at 5055,3718.66 h40
  text "*" at 4725,3713.66 h40
  text "*" at 6575,3560 h40
  text "*" at 4725,3558.66 h40
  text "*" at 3364,3431 h40
  text "*" at 5065,3378.66 h40
  text "*" at 3627.5,3265 h40
  text "ZERO CARBON FOOTPRINT" at 4545,3260 h38
  text "*" at 3622,2889 h40
  text "*" at 3938.61,2889 h40
  text "*" at 4250.28,2889 h40
  text "*" at 4558.06,2889 h40
  text "*" at 4875.83,2889 h40
  text "*" at 5193.61,2889 h40
  text "*" at 5506.39,2889 h40
  text "*" at 5814.17,2889 h40
  text "*" at 6126.94,2889 h40
  text "*" at 6429.72,2889 h40
Mechanical 1:
  text "Non Plated holes are given to provide loop to external wires for proper grip." at 2020,4900 h60
  text "Small Switches are given on board for testing purpose and will be removed in final production boards." at 6480,4860 h60
  text "SW8 and SW7 are on boards, just for  / testing purpose and will be remvoed in Final prodcution boards." at 6855,4270 h60
  text "Non Plated holes are given to provide loop to external wires for proper grip." at 785,3045 h60
  text "Metallic Switch connections with LED." at 905,2885 h60
Mechanical 2:
  lines w10: 4575,2580 ccw(c4530,2580) 4530,2625 4220,2625 4080,2625 ccw(c4080,2580) 4035,2580 3945,2580 ccw(c3900,2580) 3900,2625 3750,2625 ccw(c3750,2580) 3705,2580 3615,2580 ccw(c3570,2580) 3570,2625 3420,2625 ccw(c3420,2580) 3375,2580 3329.72,2580 cw(c3329.72,2689.72) 3220,2689.72 ; 4575,4750 cw(c4530,4750) 4530,4705 4220,4705 4080,4705 cw(c4080,4750) 4035,4750 3945,4750 cw(c3900,4750) 3900,4705 3750,4705 cw(c3750,4750) 3705,4750 3615,4750 cw(c3570,4750) 3570,4705 3420,4705 cw(c3420,4750) 3375,4750 3329.72,4750 ccw(c3329.72,4640.28) 3220,4640.28 ; 4580,2580 4920,2580 5330,2580 cw(c5375,2580) 5375,2625 5685,2625 5825,2625 cw(c5825,2580) 5870,2580 5960,2580 cw(c6005,2580) 6005,2625 6155,2625 cw(c6155,2580) 6200,2580 6290,2580 cw(c6335,2580) 6335,2625 6485,2625 cw(c6485,2580) 6530,2580 6600,2580 ; 4580,4750 4920,4750 5330,4750 ccw(c5375,4750) 5375,4705 5685,4705 5825,4705 ccw(c5825,4750) 5870,4750 5960,4750 ccw(c6005,4750) 6005,4705 6155,4705 ccw(c6155,4750) 6200,4750 6290,4750 ccw(c6335,4750) 6335,4705 6485,4705 ccw(c6485,4750) 6530,4750 6575.28,4750 ; 6550,4750 6595.28,4750 ; 3220,2689.72 ccw(c3220,2689.72) 3220,2689.72 ; 3220,2689.72 3220,2735 ccw(c3220,2780) 3265,2780 3265,2930 ccw(c3220,2930) 3220,2975 3220,3065 ccw(c3220,3110) 3265,3110 3265,3260 ccw(c3220,3260) 3220,3305 3220,3395 ccw(c3220,3440) 3265,3440 3265,3750 3265,3890 ccw(c3220,3890) 3220,3935 3220,4025 ccw(c3220,4070) 3265,4070 3265,4220 ccw(c3220,4220) 3220,4265 3220,4355 ccw(c3220,4400) 3265,4400 3265,4550 ccw(c3220,4550) 3220,4595 3220,4640.28 ; 3220,4640.28 ccw(c3220,4640.28) 3220,4640.28 ; 6595.28,2580 ccw(c6595.28,2689.72) 6705,2689.72 ; 6595.28,2580 ccw(c6595.28,2580) 6595.28,2580 ; 6595.28,4750 ccw(c6595.28,4750) 6595.28,4750 ; 6595.28,4750 cw(c6595.28,4640.28) 6705,4640.28 ; 6705,2689.72 ccw(c6705,2689.72) 6705,2689.72 ; 6705,2689.72 6705,2735 cw(c6705,2780) 6660,2780 6660,2930 cw(c6705,2930) 6705,2975 6705,3065 cw(c6705,3110) 6660,3110 6660,3260 cw(c6705,3260) 6705,3305 6705,3395 cw(c6705,3440) 6660,3440 6660,3750 6660,3890 cw(c6705,3890) 6705,3935 6705,4025 cw(c6705,4070) 6660,4070 6660,4220 cw(c6705,4220) 6705,4265 6705,4355 cw(c6705,4400) 6660,4400 6660,4550 cw(c6705,4550) 6705,4595 6705,4640.28 ; 6705,4640.28 ccw(c6705,4640.28) 6705,4640.28

## Text inside footprints (layer, text, board x,y; h text height)
SWB1: Top Overlay "PCB Edge" at 4677.52,4655 h23.62